# Altium PCB FuncGen.PcbDoc
Units mil, origin at the board's own origin, x right, y up, seen from the top; angles counter-clockwise.
Board outline 1338.58 x 649.61 mil, 2 copper layers (Top Layer, Bottom Layer); 20 components, 14 nets, 76 pads, 15 vias.
Unrouted connection lines stored in the file: 9.
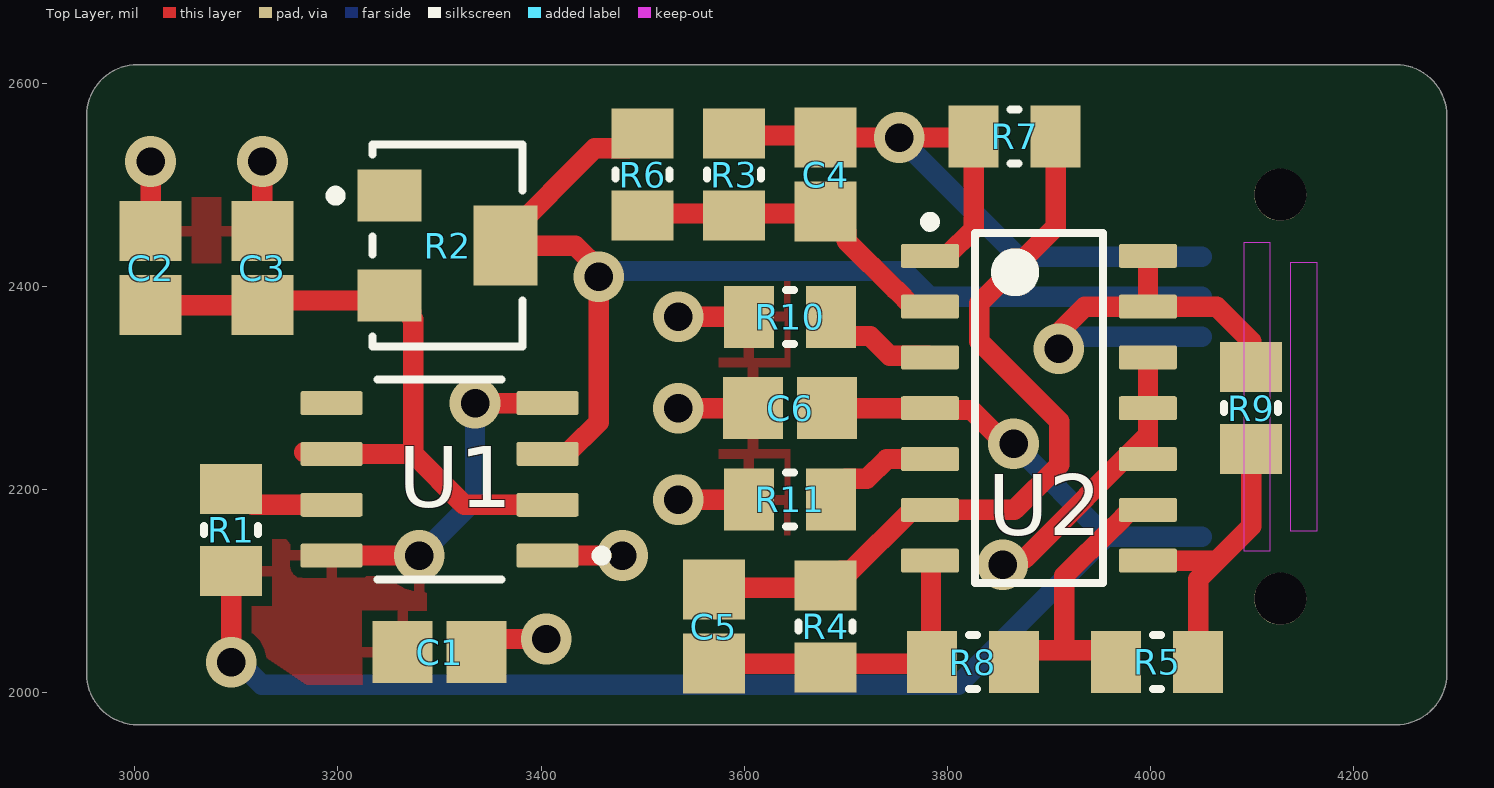
[diagram p0: Top Layer view]
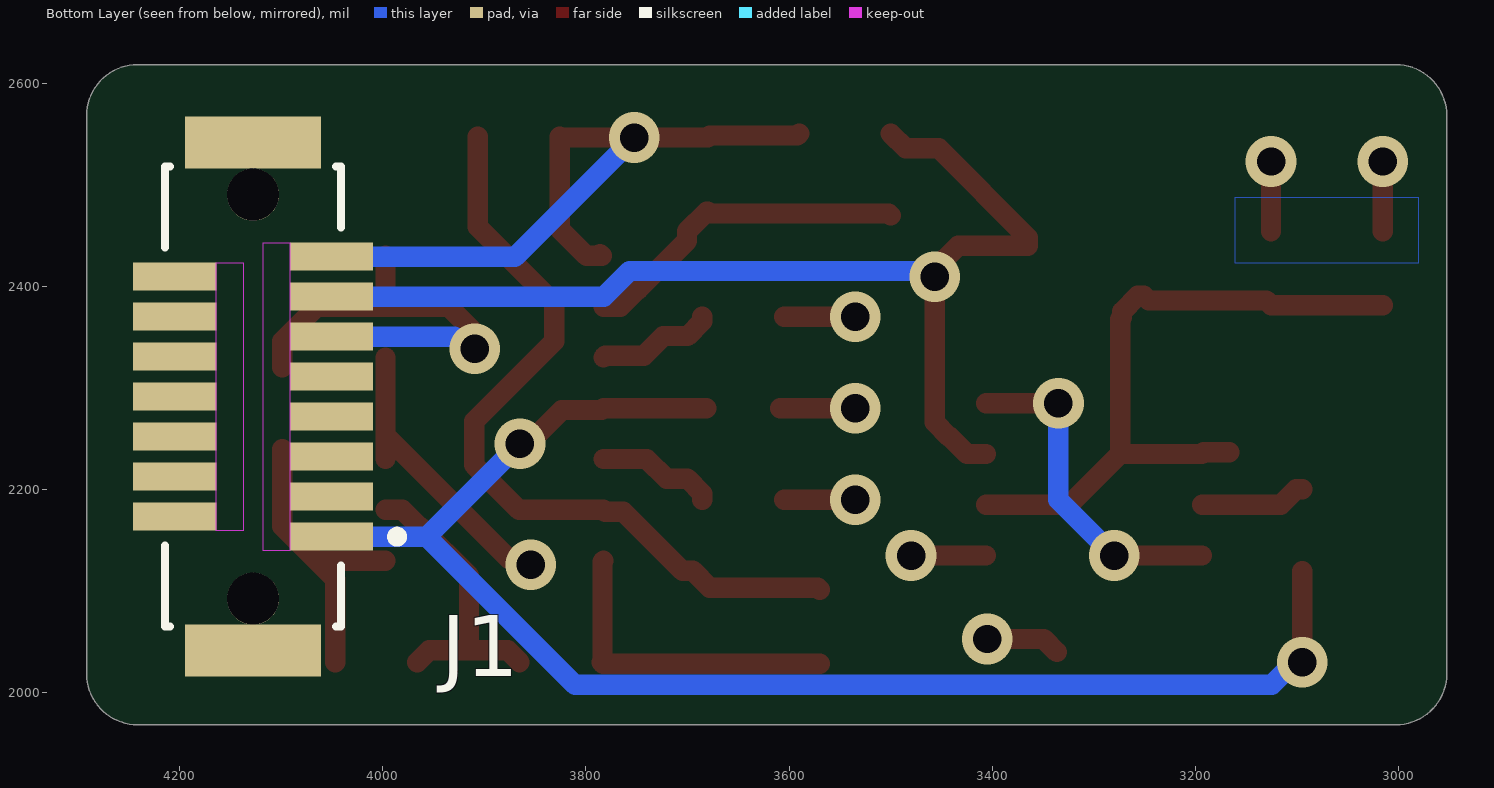
[diagram p1: Bottom Layer view, seen from below]

## Layer stack, top to bottom
Top Solder: solder mask 0.4, Solder Resist, Dk 3.5
Top Layer: signal copper 1.4
Dielectric 1: dielectric 12.6, FR-4, Dk 4.8
Bottom Layer: signal copper 1.4
Bottom Solder: solder mask 0.4, Solder Resist, Dk 3.5

## Board outline
2952.76,2018.5 2952.76,2568.11 cw(c3002.76,2568.11) 3002.76,2618.11 4241.34,2618.11 cw(c4241.34,2568.11) 4291.34,2568.11 4291.34,2018.5 cw(c4241.34,2018.5) 4241.34,1968.5 3002.76,1968.5 cw(c3002.76,2018.5)

## Design rules (kind name [scope] priority, off if disabled: settings)
Clearance [All] p1: gap=10 ignorepadtopadclearanceinfootprint=FALSE except(0: Arc-Hole Track-Hole SMDPad-Hole THPad-Hole Via-Hole Fill-Hole Poly-Hole Region-Hole Text-Hole)
PolygonConnect [All] p1: connectstyle=Relief reliefconductorwidth=10 reliefentries=4 polygonreliefangle="90 Angle" airgapwidth=10
RoutingVias [All] p1: holewidth=28 width=50 viastyle="Through Hole" minholewidth=28 minwidth=50 maxholewidth=28 maxwidth=50
SolderMaskExpansion [All] p1: expansion=4 istentingtop=FALSE
Width [All] p1: maxlimit=30 minlimit=10 preferedwidth=20 minimp=50.000000 maximp=50.000000 favimp=50.000000
30 further rules are at their usual default settings.

## Components (designator, comment, footprint, x,y, rotation, side; value= is the part's Value field where it differs from the comment)
C1 "100n" CAPC2013X145X48ML20T23 3300,2040 r180 top
C2 "3n3" CAPC2013X145X48ML20T23 3015.66,2417.84 r270 top
C3 "68n" CAPC2013X145X48ML20T23 3125.66,2417.84 r270 top
C4 "100n" CAPC2013X145X48ML20T23 3680,2510 r270 top
C5 "2n2" CAPC2013X145X48ML20T23 3570,2065 r90 top
C6 "1u" CAPC2013X145X48ML20T23 3645,2280 r0 top
J1 "DF9-15P-1V(32)" FP-DF9-15P-1V_32-MFG 4127.56,2291.34 r90 bottom
R1 "100k" RESC2013X50X30ML20T20 3095,2160 r90 top
R2 "100k 5T Pot" FP-3214W-MFG 3307.91,2440 r0 top value=10kΩ
R3 "100k" RESC2013X50X30ML20T20 3590,2510 r270 top
R4 "100k" RESC2013X50X30ML20T20 3680,2065 r90 top
R5 "27k" RESC2013X50X30ML20T20 4006.27,2030 r180 top
R6 "10k" RESC2013X50X30ML20T20 3500,2510 r90 top
R7 "100k" RESC2013X50X30ML20T20 3866.14,2547.24 r180 top
R8 "10k" RESC2013X50X30ML20T20 3825,2030 r180 top
R9 "10k" RESC2013X50X30ML20T20 4098.83,2280 r270 top
R10 "10k" RESC2013X50X30ML20T20 3645,2370 r180 top
R11 "10k" RESC2013X50X30ML20T20 3645,2190 r180 top
U1 "LMC555CMX/NOPB" FP-D0008A-MFG 3300,2210 r180 top
U2 "LMC6484IMX" D0014A_N 3890,2280 r0 top

## Footprints (in the part's own frame and the unit in brackets; to place one, negate y for a bottom-side part, rotate by r counter-clockwise, add the part's x,y. Pads: shape width x height; smd on the part's side, far side on the other; paste and mask are expansions set on the pad)
CAPC2013X145X48ML20T23 [mm] "Chip Capacitor, 2-Leads, Body 2.00x1.25mm, IPC Low Density"
  rect 1.5x1.55 smd: 1(-0.925,0) 2(0.925,0)
  body extent -1.1,-0.72 1.1,0.72, height 1.45
D0014A_N [mm] "SOIC, 14-Leads, Body 8.75x4mm, Pitch 1.27mm, IPC Medium Density"
  rrect17% 1.45x0.6 smd: 1(-2.725,3.81) 2(-2.725,2.54) 3(-2.725,1.27) 4(-2.725,0) 5(-2.725,-1.27) 6(-2.725,-2.54) 7(-2.725,-3.81) 8(2.725,-3.81) 9(2.725,-2.54) 10(2.725,-1.27) 11(2.725,0) 12(2.725,1.27) 13(2.725,2.54) 14(2.725,3.81)
  silkscreen extent -2.85,-4.38 1.6,4.78, body extent -3.02,-4.32 3.02,4.32, height 1.59
FP-3214W-MFG [mm]
  rect 1.6x1.3 smd paste+0 mask+0: 1(-1.45,1.25) 3(-1.45,-1.25)
  rect 1.6x2 smd paste+0 mask+0: 2(1.45,0)
  silkscreen extent -2.92,-2.52 1.88,2.52, body extent -2.35,-2.63 2.35,2.63, height 0.25
FP-D0008A-MFG [mm]
  rrect17% 1.55x0.6 smd paste+0 mask+0: 1(-2.7,1.905) 2(-2.7,0.635) 3(-2.7,-0.635) 4(-2.7,-1.905) 5(2.7,-1.905) 6(2.7,-0.635) 7(2.7,0.635) 8(2.7,1.905)
  silkscreen extent -4.18,-2.5 1.55,2.5, body extent -3.57,-2.75 3.57,2.75, height 0.25
FP-DF9-15P-1V_32-MFG [mm]
  rect 0.7x2.08 smd paste+0 mask+0: 1(-3.5,-1.96) 2(-3,1.96) 3(-2.5,-1.96) 4(-2,1.96) 5(-1.5,-1.96) 6(-1,1.96) 7(-0.5,-1.96) 8(0,1.96) 9(0.5,-1.96) 10(1,1.96) 11(1.5,-1.96) 12(2,1.96) 13(2.5,-1.96) 14(3,1.96) 15(3.5,-1.96)
  rect 1.3x3.4 smd paste+0 mask+0: 16(-6.35,0) 17(6.35,0)
  round 1.3 hole 1.3 unplated paste-2539.97 mask+0: ""(-5.05,0) ""(5.05,0)
  Keep-Out Layer region: -3.351,0.923 3.349,0.923 3.349,0.253 -3.351,0.253
  Keep-Out Layer region: -3.851,-0.247 3.849,-0.247 3.849,-0.917 -3.851,-0.917
  silkscreen extent -5.75,-3.72 5.75,2.2, body extent -6.55,-2.8 6.55,2.8, height 3.5
RESC2013X50X30ML20T20 [mm] "Chip Resistor, 2-Leads, Body 2.00x1.25mm, IPC Low Density"
  rect 1.25x1.55 smd: 1(-1.025,0) 2(1.025,0)
  silkscreen extent -0.1,-0.67 0.1,0.67, body extent -1.1,-0.72 1.1,0.72, height 0.5

## Part data
C1 C2 C3 C4 C5 C6: library part CMP-2007-01701-1, Manufacturer=Vitramon, Part Number=VJ0805A101KXAAC
J1: library part CMP-11605-000052-1, "CONN HDR 15POS SMD TIN", Current Rating=500mA, Flammability Rating="UL94 V-0", Housing Color=Beige, Package Quantity=1, Voltage Rating=150V, Contact Material=Copper, Contact Plating=Tin, Gender=Male, Housing Material=Polyamide, Lead Free="Lead Free", Mated Stacking Heights=4.3mm, Mount="Surface Mount", Number of Contacts=15, Number of Positions=15, Number of Rows=2, Orientation=Straight, Packaging="Tape and Reel", Pitch=1mm, Radiation Hardening=No, Termination=SMD/SMT
R1 R3 R4 R5 R6 R7 R8 R9 R10 R11: library part CMP-2001-03596-1, Manufacturer="Vishay Dale", Part Number=CRCW08051K00FKEB
R2: library part CMP-2000-05577-2, "TRIMMER 10K OHM 0.25W J LEAD TOP", Manufacturer=Bourns, Manufacturer Part Number=3214W-1-103E, Package=3214W, Power Rating=0.25W, Resistance=10kΩ, Temperature="-65°C to +150°C", Temperature Coefficient=100ppm/°C, Temperature Range High=+150°C, Temperature Range Low=-65°C, Tolerance=10%, Voltage Rating=300V, Automotive=No, Category=Res, ComponentLink2Description=Datasheet, ComponentLink2URL=https://www.bourns.com/docs/product-datasheets/3214.pdf?sfvrsn=62585356_13, Composition="Multiturn Cermet", Device Class L1="Passive Components", Device Class L2=Resistors, Device Class L3="Variable Resistors and Potentiometers", Digikey Description="TRIMMER 10K OHM 0.25W J LEAD TOP", Height=5.55mm, Lead Free=Yes, Mouser Description="Trimmer Resistors - SMD 4mm SQ 10K OHM", Octopart=https://octopart.com/3214w-1-103e-bourns-23348, RoHS=TRUE, Series=3214, Standoff Height=0.2mm
U1: library part CMP-04858-000001-1, "IC OSC SINGLE TIMER 3MHZ 8-SOIC", Frequency=3MHz, Manufacturer="Texas Instruments", Max Supply Voltage=15V, Min Supply Voltage=1.5V, Nominal Supply Current=50-150uA, Package=D0008A, Temperature="-40°C to +85°C", Temperature Range High=+85°C, Temperature Range Low=-40°C, Automotive=No, Category=IC, ComponentLink2Description=Datasheet, ComponentLink2URL=http://www.ti.com/general/docs/suppproductinfo.tsp?distId=10&gotoUrl=http%3A%2F%2Fwww.ti.com%2Flit%2Fgpn%2Flmc555, Device Class L1="Integrated Circuits (ICs)", Device Class L2="Clock and Timing", Device Class L3="Timers and Oscillators", Digikey Description="IC OSC SINGLE TIMER 3MHZ 8-SOIC", Height=1.75mm, Ipc Land Pattern Name=SOIC127P600X175-8, Lead Free=Yes, Manufacturer Part Number=LMC555CMX/NOPB, Mouser Description="Timers & Support Products CMOS TIMER", Number Of Timers/Counters=1, Octopart=https://octopart.com/lmc555cmx%2Fnopb-texas+instruments-24815227, Propagation Delay=100ns, RoHS=TRUE, Standoff Height=0.11mm
U2: library part CMP-0055-00813-3, "CMOS Quad Rail to Rail Input and Output Operational Amplifier, 14-pin Narrow SOIC", Manufacturer="Texas Instruments", Package Reference=D0014A, PackageTopMarking=NSUZXYTTE#*LMC6484IM, PowerWise=N, Code_IPC=SOIC127P600-14, Code_JEDEC=MS-012AB, ComponentLink1Description="Datasheet URL", ComponentLink1URL=http://www.ti.com/general/docs/lit/getliterature.tsp?genericPartNumber=LMC6484&fileType=pdf, CompType=Amplifiers, PackageDescription="Molded Package S.O., .150in Wide, 14 Lead", PinCount=14, RoHS=N

## Via types
v1: diameter 50, hole 28, Top Layer to Bottom Layer, 15 vias

## Nets (pads, with @x,y where several pads share a name; then routed paths per layer and width w, separated by ;. In a path a pad name is that pad's centre, name@x,y a point inside that pad or via, vN(x,y) a via of type N, cw(c..) or ccw(c..) an arc to the next point about the centre after c; other vN are vias at no path point)
555_Alt_Output: R1.2 U1.7 | length 105.1
  Top Layer w20: R1.2 3100.91,2200.35 3116.26,2185 U1.7
DiscCap: C2.2 C3.2 R2.3 U1.2 U1.6 | length 668.9
  Top Layer w20: C2.2 C3.2 3130.34,2386.11 3246.15,2386.11 R2.3 3256.73,2390.79 3272.32,2375.2 3272.32,2369.29 3274.09,2367.52 3274.09,2235 ; U1.6@3166.77,2236.81 3191.89,2236.81 U1.6 3274.09,2235 ; U1.2 3324.09,2185 3274.09,2235
GND: C1.1 C2.1 C3.1 C6.1 J1.2 J1.5 J1.14 J1.16 J1.17 R10.2 R11.2 U1.1 U2.10 U2.11 U2.12 | length 793.3
  Top Layer w20: C2.1 v1(3015.66,2522.84) ; C3.1 v1(3125.66,2522.84) ; C1.1 3349.29,2052.87 v1(3405,2052.87) ; U1.1 v1(3480,2135) ; v1(3535,2190) R11.2 ; v1(3535,2280) C6.1 ; v1(3535,2370) R10.2 ; v1(3854.33,2125.98) 3860.07,2131.72 3875.82,2131.72 3997.28,2253.19 ; U2.10 3997.28,2253.19 ; U2.12 U2.11 3997.28,2253.19
NetC5_1: C5.1 R4.1 R8.2 U2.7 | length 316
  Top Layer w20: C5.1 3783.23,2028.58 R8.2 3783.68,2030.96 3783.68,2129.04 U2.7
NetR5_1: R5.1 R9.2 U2.8 | length 299
  Top Layer w20: U2.8 4065,2130 ; R5.1 4046.62,2111.62 4065,2130 ; R9.2 4098.83,2163.83 4065,2130
NetR10_1: R10.1 U2.3 | length 116.5
  Top Layer w20: R10.1 3685.35,2365.66 3699.96,2351.05 3723.95,2351.05 3743.19,2331.81 3780.91,2331.81 U2.3
NetR11_1: R11.1 U2.5 | length 117.4
  Top Layer w20: R11.1 3685.35,2195.91 3699.96,2210.51 3720.51,2210.51 3740,2230 U2.5
SineWave: J1.11 R9.1 U2.13 U2.14 | length 441.2
  Top Layer w20: v1@3905.51,2350.39 3935.12,2380 U2.13 ; U2.14 U2.13 ; R9.1 4098.83,2346.17 4065,2380 U2.13
  Bottom Layer w20: v1(3909.45,2338.58) 3917.57,2338.58 3929.38,2350.39 J1.11
SqWave: J1.13 R2.2 R6.2 U1.3 | length 1107.4
  Top Layer w20: U1.3 3425,2235 3441.94,2251.94 3442.67,2251.94 3456.81,2266.08 3456.81,2409.33 v1(3456.69,2409.45) 3456.69,2417.05 3433.74,2440 R2.2 3365,2447.87 3452.87,2535.75 3485.39,2535.75 R6.2
  Bottom Layer w20: v1(3456.69,2409.45) 3462.24,2415 3757.18,2415 3782.41,2389.76 J1.13
TriWave: C4.1 J1.15 R3.1 R7.2 U2.1 | length 730
  Top Layer w20: R3.1 3591.97,2548.39 3678.03,2548.39 C4.1 v1(3752.48,2546.42) 3824.96,2546.42 R7.2 3825.79,2456.34 3799.45,2430 3784.37,2430 U2.1@3786.18,2431.81
  Bottom Layer w20: v1(3752.48,2546.42) 3869.76,2429.13 J1.15
U2A-: C4.2 R3.2 R6.1 U2.2 | length 328.6
  Top Layer w20: R6.1 3501.97,2471.61 3678.03,2471.61 C4.2 3680.98,2473.58 3700.51,2454.06 3700.51,2444.74 3748.32,2396.94 3749.05,2396.94 3765.98,2380 U2.2
U2B-: C5.2 R4.2 R7.1 U2.6 | length 777.8
  Top Layer w20: C5.2 3571.97,2103.39 3678.03,2103.39 3694.61,2119.96 3704.96,2119.96 3763.19,2178.19 3780.91,2178.19 U2.6 3865.92,2180 3910,2224.08 3910,2267.17 3831.26,2345.91 3831.26,2383.42 3906.5,2458.65 R7.1
U2C-: R5.2 R8.1 U2.9 | length 292.9
  Top Layer w20: R8.1 3877.07,2041.72 3915,2041.72 ; R5.2 3954.2,2041.72 3915,2041.72 ; U2.9 3980.55,2180 3963.61,2163.06 3962.88,2163.06 3915,2115.18 3915,2041.72
VCC: C1.2 C6.2 J1.1 R1.1 U1.4 U1.8 U2.4 | length 1777.3
  Top Layer w20: v1@3095,2025 v1(3095,2030) R1.1 ; U1.8 v1(3280,2135) ; v1(3335,2285) U1.4 ; C6.2 U2.4 3784.53,2278.19 3823.69,2278.19 3856.88,2245 v1(3865,2245)
  Bottom Layer w20: v1(3095,2030) 3102.78,2030 3124.91,2007.87 3810.79,2007.87 3956.46,2153.54 ; v1(3280,2135) 3335,2190 v1(3335,2285) ; v1(3865,2245) 3956.46,2153.54 ; J1.1 3956.46,2153.54
pads on no net: J1. J1.3 J1.4 J1.6 J1.7 J1.8 J1.9 J1.10 J1.12 R2.1 U1.5

## Polygon pours and split planes (outlines as drawn)
GND on Top Layer "GND_L01_P021" (solid, pour order 21): 2980.66,2422.84 3160.66,2422.84 3160.66,2487.84 2980.66,2487.84
VCC on Top Layer "VCC_L01_P012" (solid, pour order 12): 3051.18,2151 3287.4,2151 3287.4,2007.87 3169.29,2007.87 3051.18,2086.61
GND on Top Layer "GND_L01_P013" (solid, pour order 13): 2980.66,2422.84 3160.66,2422.84 3160.66,2487.84 2980.66,2487.84
GND on Top Layer "GND_L01_P014" (solid, pour order 14): 3645,2405 3645,2155 3575,2155 3575,2405
GND on Bottom Layer "GND_L02_P017" (solid, pour order 17): 2980.66,2422.84 3160.66,2422.84 3160.66,2487.84 2980.66,2487.84

## Silkscreen, mask and mechanical layers (free items; w line width, h text height)
Mechanical 1:
  lines w10: 2952.76,2018.5 ccw(c3002.76,2018.5) 3002.76,1968.5 4241.34,1968.5 ccw(c4241.34,2018.5) 4291.34,2018.5 4291.34,2568.11 ccw(c4241.34,2568.11) 4241.34,2618.11 3149.61,2618.11 3002.76,2618.11 ccw(c3002.76,2568.11) 2952.76,2568.11 2952.76,2018.5